# Altium PCB latest_Audio_Meter_V4.5.PcbDoc (part 3 of 4)
Units mil, origin at the board's own origin, x right, y up, seen from the top; angles counter-clockwise.
Board outline 2756.14 x 2519.69 mil, 2 copper layers (Top Layer, Bottom Layer), stack 57.087 mil thick; 115 components, 61 nets, 352 pads, 840 vias.
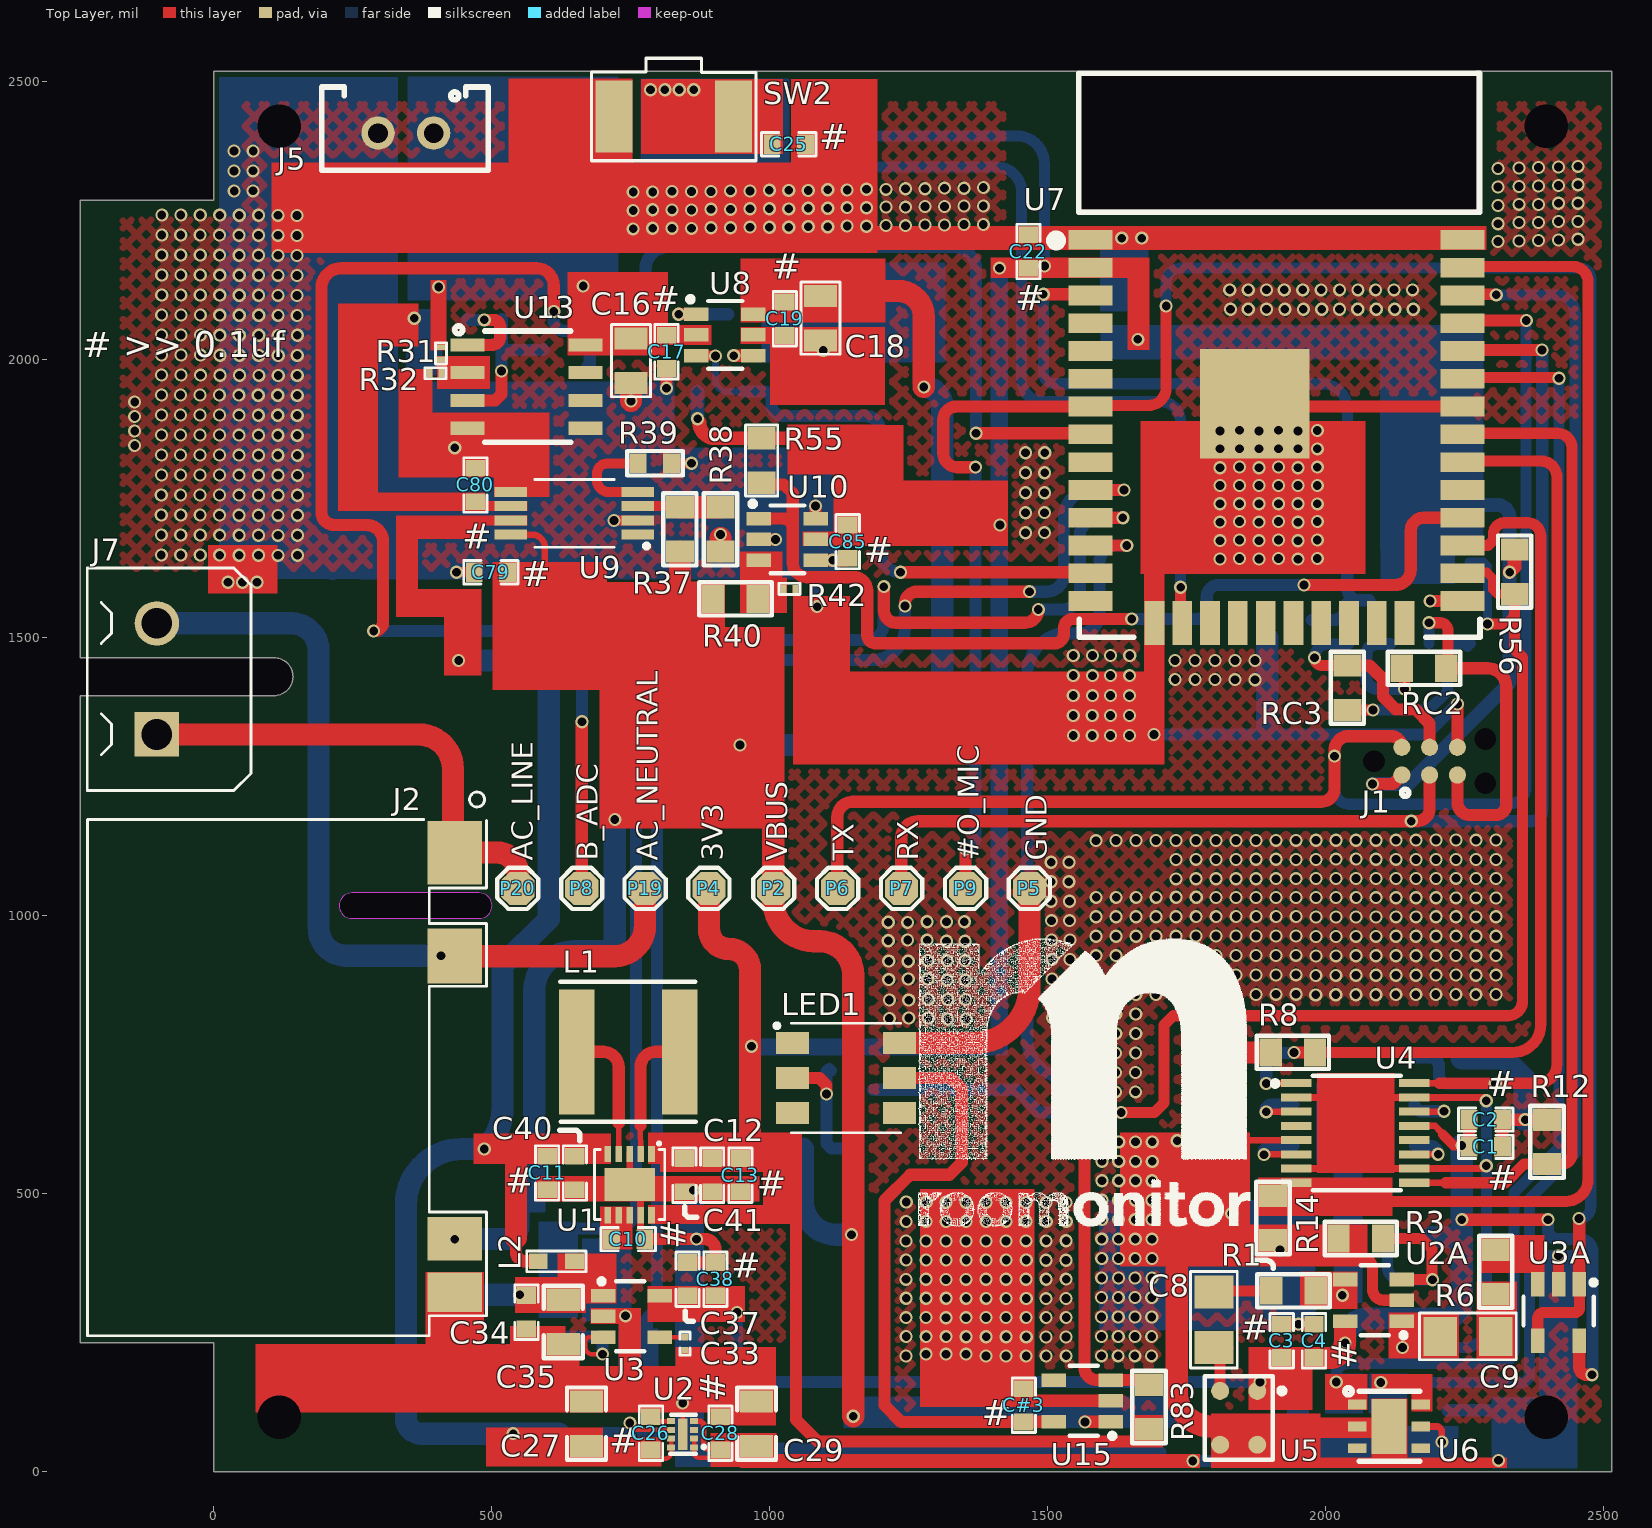
[diagram p0: Top Layer view]

## Part data (continued)
R55: library part ERJ-P06J103V, "RES SMD 10K OHM 5% 1/2W 0805", Case Code (Imperial)=0805, Case Code (Metric)=2012, Manufacturer=Panasonic, Max Operating Temperature=155°C, Max Power Dissipation=500mW, Min Operating Temperature=-55°C, Package Quantity=1, Resistance=10kR, Supplier Part Number 1=P10KADCT-ND, Temperature Coefficient=200ppm/°C, Tolerance=5%, Voltage Rating=400V, Voltage Rating (DC)=150V, Case/Package=0805, ComponentLink1Description=https://www.verical.com/server-webapp/html/getDatasheet?partID=409513, ComponentLink1URL=https://www.verical.com/server-webapp/html/getDatasheet?partID=409513, ComponentLink2Description=http://components.arrow.com/part/dataview/44988207S7163511N1174, ComponentLink2URL=http://components.arrow.com/part/dataview/44988207S7163511N1174, ComponentLink3Description=https://www.seielect.com/Catalog/SEI-RMCF_RMCP.pdf, ComponentLink3URL=https://www.seielect.com/Catalog/SEI-RMCF_RMCP.pdf, ComponentLink4Description=http://www.seielect.com/catalog/sei-rmc.pdf, ComponentLink4URL=http://www.seielect.com/catalog/sei-rmc.pdf, ComponentLink5Description=https://datasheet.ciiva.com/7777/424479-7777391.pdf, ComponentLink5URL=https://datasheet.ciiva.com/7777/424479-7777391.pdf, ComponentLink6Description=https://datasheet.ciiva.com/2581/crcwhpe3-2581488.pdf, ComponentLink6URL=https://datasheet.ciiva.com/2581/crcwhpe3-2581488.pdf, ComponentLink7Description=https://datasheet.ciiva.com/11808/0900766b80d98b26-11808546.pdf, ComponentLink7URL=https://datasheet.ciiva.com/11808/0900766b80d98b26-11808546.pdf, ComponentLink8Description=https://datasheet.ciiva.com/8934/dcrcwe3-8934585.pdf, ComponentLink8URL=https://datasheet.ciiva.com/8934/dcrcwe3-8934585.pdf, ComponentLink9Description=https://datasheet.ciiva.com/2467/dcrcwe3-2467241.pdf, ComponentLink9URL=https://datasheet.ciiva.com/2467/dcrcwe3-2467241.pdf, ComponentLink10Description=https://datasheet.ciiva.com/7777/1697337-7777401.pdf, ComponentLink10URL=https://datasheet.ciiva.com/7777/1697337-7777401.pdf, ComponentLink11Description=https://datasheet.ciiva.com/16852/dcrcwe3-16852347.pdf, ComponentLink11URL=https://datasheet.ciiva.com/16852/dcrcwe3-16852347.pdf, ComponentLink12Description=https://datasheet.ciiva.com/16200/dcrcwe3-16200123.pdf, ComponentLink12URL=https://datasheet.ciiva.com/16200/dcrcwe3-16200123.pdf, ComponentLink13Description=https://datasheet.ciiva.com/16725/70201119-16725227.pdf, ComponentLink13URL=https://datasheet.ciiva.com/16725/70201119-16725227.pdf, ComponentLink14Description=https://datasheet.ciiva.com/2467/dcrcwe3-2467239.pdf, ComponentLink14URL=https://datasheet.ciiva.com/2467/dcrcwe3-2467239.pdf, ComponentLink15Description=https://datasheet.ciiva.com/7777/1720486-7777575.pdf, ComponentLink15URL=https://datasheet.ciiva.com/7777/1720486-7777575.pdf, ComponentLink16Description=https://datasheet.ciiva.com/8934/dcrcwe3-8934581.pdf, ComponentLink16URL=https://datasheet.ciiva.com/8934/dcrcwe3-8934581.pdf, ComponentLink17Description=https://datasheet.ciiva.com/2467/dcrcwe3-2467240.pdf, ComponentLink17URL=https://datasheet.ciiva.com/2467/dcrcwe3-2467240.pdf, ComponentLink18Description=https://datasheet.ciiva.com/7777/1720486-7777576.pdf, ComponentLink18URL=https://datasheet.ciiva.com/7777/1720486-7777576.pdf, ComponentLink19Description=https://datasheet.ciiva.com/5546/dcrcwe3-109170-5546983.pdf, ComponentLink19URL=https://datasheet.ciiva.com/5546/dcrcwe3-109170-5546983.pdf, ComponentLink20Description=https://datasheet.ciiva.com/16755/70201119-16755757.pdf, ComponentLink20URL=https://datasheet.ciiva.com/16755/70201119-16755757.pdf, ComponentLink21Description=https://datasheet.ciiva.com/3258/dcrcwe3-3258221.pdf, ComponentLink21URL=https://datasheet.ciiva.com/3258/dcrcwe3-3258221.pdf, ComponentLink22Description=https://datasheet.ciiva.com/17204/dcrcwe3-17204398.pdf, ComponentLink22URL=https://datasheet.ciiva.com/17204/dcrcwe3-17204398.pdf, ComponentLink23Description=https://datasheet.ciiva.com/16435/dcrcwe3-16435934.pdf, ComponentLink23URL=https://datasheet.ciiva.com/16435/dcrcwe3-16435934.pdf, ComponentLink24Description=https://datasheet.ciiva.com/46441/1533075-46441628.pdf, ComponentLink24URL=https://datasheet.ciiva.com/46441/1533075-46441628.pdf, ComponentLink25Description=https://datasheet.ciiva.com/5544/dcrcwe3-109170-5544649.pdf, ComponentLink25URL=https://datasheet.ciiva.com/5544/dcrcwe3-109170-5544649.pdf, ComponentLink26Description=https://datasheet.ciiva.com/8337/dcrcwe3-8337669.pdf, ComponentLink26URL=https://datasheet.ciiva.com/8337/dcrcwe3-8337669.pdf, ComponentLink27Description=https://datasheet.ciiva.com/2463/dcrcwe3-2463179.pdf, ComponentLink27URL=https://datasheet.ciiva.com/2463/dcrcwe3-2463179.pdf, ComponentLink28Description=https://datasheet.ciiva.com/2463/dcrcwe3-2463178.pdf, ComponentLink28URL=https://datasheet.ciiva.com/2463/dcrcwe3-2463178.pdf, ComponentLink29Description=https://datasheet.ciiva.com/2474/crcwhpe3-2474640.pdf, ComponentLink29URL=https://datasheet.ciiva.com/2474/crcwhpe3-2474640.pdf, ComponentLink30Description=https://datasheet.ciiva.com/48527/crcwhpe3-48527638.pdf, ComponentLink30URL=https://datasheet.ciiva.com/48527/crcwhpe3-48527638.pdf, ComponentLink31Description=https://datasheet.ciiva.com/5547/crcwhpe3-46056-5547896.pdf, ComponentLink31URL=https://datasheet.ciiva.com/5547/crcwhpe3-46056-5547896.pdf, ComponentLink32Description=https://datasheet.ciiva.com/9112/crcwhpe3-9112140.pdf, ComponentLink32URL=https://datasheet.ciiva.com/9112/crcwhpe3-9112140.pdf, ComponentLink33Description=https://datasheet.ciiva.com/2474/crcwhpe3-2474638.pdf, ComponentLink33URL=https://datasheet.ciiva.com/2474/crcwhpe3-2474638.pdf, ComponentLink34Description=https://datasheet.ciiva.com/2474/crcwhpe3-2474639.pdf, ComponentLink34URL=https://datasheet.ciiva.com/2474/crcwhpe3-2474639.pdf, ComponentLink35Description=http://uk.rs-online.com/webdocs/12cb/0900766b812cb812.pdf?src-supplier=RSComponents, ComponentLink35URL=http://uk.rs-online.com/webdocs/12cb/0900766b812cb812.pdf?src-supplier=RSComponents, ComponentLink36Description=http://industrial.panasonic.com/www-data/pdf/AOA0000/AOA0000CE4.pdf?src-supplier=Avnet, ComponentLink36URL=http://industrial.panasonic.com/www-data/pdf/AOA0000/AOA0000CE4.pdf?src-supplier=Avnet, ComponentLink37Description=http://industrial.panasonic.com/www-data/pdf/AOA0000/AOA0000CE4.pdf?src-supplier=Future+Electronics, ComponentLink37URL=http://industrial.panasonic.com/www-data/pdf/AOA0000/AOA0000CE4.pdf?src-supplier=Future+Electronics, ComponentLink38Description=http://www.farnell.com/datasheets/2059624.pdf?src-supplier=Element14, ComponentLink38URL=http://www.farnell.com/datasheets/2059624.pdf?src-supplier=Element14, ComponentLink39Description=https://www.alliedelec.com/m/d/12e4be79354a6c30aae91f11e8182ea0.pdf?src-supplier=Allied+Electronics, ComponentLink39URL=https://www.alliedelec.com/m/d/12e4be79354a6c30aae91f11e8182ea0.pdf?src-supplier=Allied+Electronics, ComponentLink40Description=http://www.farnell.com/datasheets/2059624.pdf?src-supplier=Farnell, ComponentLink40URL=http://www.farnell.com/datasheets/2059624.pdf?src-supplier=Farnell, Composition="Thick Film", Contact Plating=Tin, Depth=1.25mm, Features="Automotive AEC-Q200", Height=0.6mm, Lead Free="Lead Free", Length=2mm, Manufacturer Part Number=ERJ-P06J103V, Military Standard=Not, Mount="Surface Mount", Number of Terminations=2, Packaging="Tape and Reel", Power Rating=500mW, Pricing 1="1=0.11, 10=0.103, 100=0.0396, 1000=0.0174, 2500=0.0151 (USD)", Radiation Hardening=No, REACH SVHC=Unknown, Stock 1=130484, Supplier 1=Digi-Key, Termination=SMD/SMT, Weight=0.000194oz, Width=0.049inch
SW2: library part KSS221GLFS, "Tactile Switch SPST-NO Side Actuated Surface Mount, Right Angle", Contact Current Rating=50mA, Contact Resistance=100mR, Insulation Resistance=1GR, IP Rating=IP40, Manufacturer="ITT C&K", Max Operating Temperature=85°C, Max Voltage Rating (DC)=32V, Min Operating Temperature=-40°C, Operating Force=2N, Package Quantity=1, Power Rating=1W, Supplier Part Number 1=401-1097-6-ND, Actuator Length=0.8mm, ComponentLink1Description=https://datasheet.ciiva.com/26917/getdatasheetpartid-773364-26917575.pdf, ComponentLink1URL=https://datasheet.ciiva.com/26917/getdatasheetpartid-773364-26917575.pdf, ComponentLink2Description=https://datasheet.ciiva.com/30466/0900766b8129cd37-30466697.pdf, ComponentLink2URL=https://datasheet.ciiva.com/30466/0900766b8129cd37-30466697.pdf, ComponentLink3Description=https://datasheet.ciiva.com/16496/kss221g20lfs-16496166.pdf, ComponentLink3URL=https://datasheet.ciiva.com/16496/kss221g20lfs-16496166.pdf, ComponentLink4Description=https://datasheet.ciiva.com/18145/getdatasheetpartid-313005-18145235.pdf, ComponentLink4URL=https://datasheet.ciiva.com/18145/getdatasheetpartid-313005-18145235.pdf, ComponentLink5Description=https://datasheet.ciiva.com/16155/kss221glfs-ckcomponents-16155741.pdf, ComponentLink5URL=https://datasheet.ciiva.com/16155/kss221glfs-ckcomponents-16155741.pdf, ComponentLink6Description=https://datasheet.ciiva.com/5684/19445-5684460.pdf, ComponentLink6URL=https://datasheet.ciiva.com/5684/19445-5684460.pdf, ComponentLink7Description=https://datasheet.ciiva.com/2900/kss-2900345.pdf, ComponentLink7URL=https://datasheet.ciiva.com/2900/kss-2900345.pdf, ComponentLink8Description=https://datasheet.ciiva.com/2900/kss-2900343.pdf, ComponentLink8URL=https://datasheet.ciiva.com/2900/kss-2900343.pdf, ComponentLink9Description=https://datasheet.ciiva.com/7986/19445-7986997.pdf, ComponentLink9URL=https://datasheet.ciiva.com/7986/19445-7986997.pdf, ComponentLink10Description=https://datasheet.ciiva.com/2900/kss-2900344.pdf, ComponentLink10URL=https://datasheet.ciiva.com/2900/kss-2900344.pdf, Contact Material=Silver, Contact Plating=Silver, Current Rating=50mA, Depth=4.4mm, Illumination Type=Non-Illuminated,Illuminated, Lead Free="Lead Free", Length=4.5mm, Manufacturer Part Number=KSS221GLFS, Max Current Rating=50mA, Mechanical Life=100000Cycles, Mount="Surface Mount", Orientation="Right Angle", Packaging="Tape and Reel", Pricing 1="1=0.68, 10=0.655, 25=0.6424, 50=0.6182, 100=0.5334, 250=0.4849, 500=0.4607, 1000=0.3637 (USD)", Radiation Hardening=No, REACH SVHC="No SVHC", Stock 1=17242, Supplier 1=Digi-Key, Switch Function=Off-Mom, Switch Travel=0.3mm, Termination="Gull Wing", Throw Configuration=SPST, Voltage Rating (DC)=32V, Width=7mm
U1: "Conv DC-DC 1.8V to 5.5V Non-Inv/Inv/Step Up/Step Down Single-Out 3.3V 0.8A 10-Pin WSON", Manufacturer="Texas Instruments", Max Input Voltage=5.5V, Max Operating Temperature=85°C, Max Output Current=800mA, Min Input Voltage=1.8V, Min Operating Temperature=-40°C, Min Output Voltage=3.3V, Package Quantity=3000, Quiescent Current=25uA, Supplier Part Number 1=TPS63031DSKR**MULT1, Switching Frequency=2.4MHz, ComponentLink1Description=http://www.ti.com/lit/ds/symlink/tps63001.pdf, ComponentLink1URL=http://www.ti.com/lit/ds/symlink/tps63001.pdf, ComponentLink2Description=http://focus.ti.com/lit/ds/symlink/tps63001.pdf, ComponentLink2URL=http://focus.ti.com/lit/ds/symlink/tps63001.pdf, ComponentLink3Description=http://www.ti.com/general/docs/lit/getliterature.tsp?genericPartNumber=TPS63002&&fileType=pdf, ComponentLink3URL=http://www.ti.com/general/docs/lit/getliterature.tsp?genericPartNumber=TPS63002&&fileType=pdf, ComponentLink4Description=http://www.ti.com/general/docs/lit/getliterature.tsp?genericPartNumber=TPS63031&&fileType=pdf&src-supplier=Avnet, ComponentLink4URL=http://www.ti.com/general/docs/lit/getliterature.tsp?genericPartNumber=TPS63031&&fileType=pdf&src-supplier=Avnet, ComponentLink5Description=http://www.ti.com/lit/ds/symlink/tps63030.pdf?src-supplier=Digi-Key, ComponentLink5URL=http://www.ti.com/lit/ds/symlink/tps63030.pdf?src-supplier=Digi-Key, Contact Plating=Gold, Efficiency=96%, Lead Free="Lead Free", Manufacturer Part Number=TPS63031DSKR, Mount="Surface Mount", Nominal Output Voltage=3.3V, Number of Outputs=1, Number of Pins=10, Operating Supply Voltage=5.5V, Output Configuration=Positive, Output Current=800mA, Output Type=Fixed, Output Voltage=3.3V, Packaging="Tape and Reel", Radiation Hardening=No, REACH SVHC="No SVHC", Stock 1=0, Supplier 1=Arrow, Synchronous Rectifier=Yes, Topology=Buck-Boost
U2: "IC REG LINEAR 3.3V 1A 8XDFN", Dropout Voltage=95mV, Manufacturer="ON Semiconductor", Max Operating Temperature=125°C, Min Current Limit=1.1A, Min Operating Temperature=-40°C, Output Current=1A, Output Voltage=3.3V, Supplier Part Number 1=NCP186AMX330TAGOSCT-ND, ComponentLink1Description=http://www.farnell.com/datasheets/2236905.pdf?src-supplier=Farnell, ComponentLink1URL=http://www.farnell.com/datasheets/2236905.pdf?src-supplier=Farnell, ComponentLink2Description=http://www.farnell.com/datasheets/2236905.pdf?src-supplier=Newark, ComponentLink2URL=http://www.farnell.com/datasheets/2236905.pdf?src-supplier=Newark, ComponentLink3Description=http://www.onsemi.com/pub/Collateral/NCP186-D.PDF?src-supplier=Digi-Key, ComponentLink3URL=http://www.onsemi.com/pub/Collateral/NCP186-D.PDF?src-supplier=Digi-Key, ComponentLink4Description=https://www.onsemi.com/pub/Collateral/NCP186-D.PDF?src-supplier=Digi-Key, ComponentLink4URL=https://www.onsemi.com/pub/Collateral/NCP186-D.PDF?src-supplier=Digi-Key, Lead Free="Lead Free", Manufacturer Part Number=NCP186AMX330TAG, Mount="Surface Mount", Number of Pins=8, Number of Regulators=1, Packaging="Tape and Reel", Pricing 1="1=0.48, 10=0.39, 25=0.3564, 100=0.2405, 250=0.199, 500=0.18242, 1000=0.13682 (USD)", Stock 1=5995, Supplier 1=Digi-Key
U2A U3A: "IC OPAMP GP 1 CIRCUIT SOT23-5", Case/Package=SOT-23, Input Bias Current=10pA, Input Offset Voltage (Vos)=1mV, Manufacturer="Texas Instruments", Max Operating Temperature=85°C, Max Supply Voltage=5.5V, Min Operating Temperature=-40°C, Min Supply Voltage=2.7V, Nominal Supply Current=250uA, Output Current per Channel=15mA, Package Quantity=250, Power Supply Rejection Ratio (PSRR)=90.46dB, Quiescent Current=250mA, Supplier Part Number 1=OPA344NACT-ND, Voltage Gain=122dB, Bandwidth=1MHz, Common Mode Rejection Ratio=76dB, ComponentLink1Description=http://www.ti.com/general/docs/lit/getliterature.tsp?genericPartNumber=OPA344&fileType=pdf&src-supplier=Newark, ComponentLink1URL=http://www.ti.com/general/docs/lit/getliterature.tsp?genericPartNumber=OPA344&fileType=pdf&src-supplier=Newark, ComponentLink2Description=http://www.farnell.com/datasheets/1882856.pdf?src-supplier=Element14, ComponentLink2URL=http://www.farnell.com/datasheets/1882856.pdf?src-supplier=Element14, ComponentLink3Description=http://www.ti.com/lit/ds/symlink/opa344.pdf?src-supplier=Digi-Key, ComponentLink3URL=http://www.ti.com/lit/ds/symlink/opa344.pdf?src-supplier=Digi-Key, ComponentLink4Description=http://focus.ti.com/lit/ds/symlink/opa344.pdf?src-supplier=Avnet+Europe, ComponentLink4URL=http://focus.ti.com/lit/ds/symlink/opa344.pdf?src-supplier=Avnet+Europe, ComponentLink5Description=http://www.ti.com/general/docs/lit/getliterature.tsp?genericPartNumber=OPA4345&&fileType=pdf&src-supplier=Avnet, ComponentLink5URL=http://www.ti.com/general/docs/lit/getliterature.tsp?genericPartNumber=OPA4345&&fileType=pdf&src-supplier=Avnet, Gain Bandwidth Product=1MHz, Height=1.15mm, Lead Free="Lead Free", Length=2.9mm, Manufacturer Part Number=OPA344NA/250, Max I/O Voltage=1mV, Number of Amplifiers=1, Number of Channels=1, Number of Circuits=1, Number of Elements=1, Number of Pins=5, Packaging="Tape and Reel", Pricing 1="1=1.59, 10=1.43, 25=1.3492, 100=1.0794 (USD)", Radiation Hardening=No, REACH SVHC="No SVHC", Slew Rate=0.8V/µs, Stock 1=6132, Supplier 1=Digi-Key, Unity Gain Bandwidth Product=1MHz, Width=1.6mm
U3: "IC REG LINEAR 3.3V 150MA SOT23-5", Case/Package=SOT-23, Dropout Voltage=280mV, Input Bias Current=850uA, Manufacturer="Texas Instruments", Max Input Voltage=16V, Max Operating Temperature=125°C, Max Output Current=150mA, Min Input Voltage=2.2V, Min Operating Temperature=-40°C, Nominal Output Voltage=3.3V, Output Voltage Accuracy=1%, Package Quantity=1, Supplier Part Number 1=296-26127-1-ND, Accuracy=1%, Category="Voltage Regulators - Linear", ComponentLink1Description=https://datasheet.ciiva.com/2062/lp2985a-33-2062277.pdf?src-supplier=Digi-Key, ComponentLink1URL=https://datasheet.ciiva.com/2062/lp2985a-33-2062277.pdf?src-supplier=Digi-Key, ComponentLink2Description=https://datasheet.ciiva.com/2062/lp2985a-33-2062278.pdf?src-supplier=Digi-Key, ComponentLink2URL=https://datasheet.ciiva.com/2062/lp2985a-33-2062278.pdf?src-supplier=Digi-Key, ComponentLink3Description=https://datasheet.ciiva.com/2062/lp2985a-33-2062279.pdf?src-supplier=Digi-Key, ComponentLink3URL=https://datasheet.ciiva.com/2062/lp2985a-33-2062279.pdf?src-supplier=Digi-Key, Height=1.15mm, Lead Free="Lead Free", Length=2.9mm, Manufacturer Part Number=LP2985A-33DBVT, Number of Outputs=1, Number of Pins=5, Number of Regulators=1, Output Current=150mA, Output Type=Fixed, Output Voltage=3.3V, Packaging="Tape and Reel", Polarity=Positive, Pricing 1="1=0.60000, 10=0.53200, 25=0.49960, 100=0.37860 (USD)", Quiescent Current=850uA, Radiation Hardening=No, RoHS=Yes, RoHS Compliant=Yes, Series=-, Stock 1=112, Supplier 1=Digi-Key, Width=1.6mm
U4: "IC SWITCH QUAD SPST 16TSSOP", Case/Package=TSSOP, High Level Output Current=30mA, Manufacturer="Analog Devices", Max Operating Temperature=85°C, Max Power Dissipation=5uW, Max Supply Current=1uA, Max Supply Voltage=5.5V, Min Operating Temperature=-40°C, Min Supply Voltage=1.8V, On-State Resistance=4R, Operating Supply Current=1nA, Package Quantity=1, Power Dissipation=430mW, Supplier Part Number 1=ADG712BRUZ-REELCT-ND, -3db Bandwidth=200MHz, Bandwidth=200MHz, ComponentLink1Description=http://www.analog.com/media/en/technical-documentation/data-sheets/ADG711_712_713.pdf?src-supplier=Digi-Key, ComponentLink1URL=http://www.analog.com/media/en/technical-documentation/data-sheets/ADG711_712_713.pdf?src-supplier=Digi-Key, ComponentLink2Description=http://datasheet.iiic.cc/analog_devices/ADG712BRUZ-REEL.pdf?src-supplier=IIIC, ComponentLink2URL=http://datasheet.iiic.cc/analog_devices/ADG712BRUZ-REEL.pdf?src-supplier=IIIC, Contact Plating=Tin,Matte, Interface=Parallel, Lead Free="Contains Lead", Manufacturer Part Number=ADG712BRUZ-REEL, Mount="Surface Mount", Number of Bits=4, Number of Channels=4, Number of Circuits=4, Number of Inputs=4, Number of Outputs=4, Number of Pins=16, Packaging="Tape and Reel", Polarity=Non-Inverting, Pricing 1="1=2.89, 10=2.598, 25=2.4564, 100=2.129, 250=2.01984, 500=1.81238, 1000=1.52852 (USD)", Stock 1=4085, Supplier 1=Digi-Key, Supply Type=Single, Throw Configuration=SPST, Turn-Off Delay Time=6ns, Turn-On Delay Time=11ns
U5: "SPU-TOP MIC IOT FOCUSED MIC", Manufacturer=Knowles, Operating Supply Current=250uA, Operating Supply Voltage=3.6V, Package Quantity=1200, Supplier Part Number 1=423-1138-1-ND, ComponentLink1Description=https://media.digikey.com/pdf/Data%20Sheets/Knowles%20Acoustics%20PDFs/SiSonic_Design_Guide.pdf?src-supplier=Mouser, ComponentLink1URL=https://media.digikey.com/pdf/Data%20Sheets/Knowles%20Acoustics%20PDFs/SiSonic_Design_Guide.pdf?src-supplier=Mouser, ComponentLink2Description=https://media.digikey.com/pdf/Data%20Sheets/Knowles%20Acoustics%20PDFs/SiSonic_Design_Guide.pdf?src-supplier=Digi-Key, ComponentLink2URL=https://media.digikey.com/pdf/Data%20Sheets/Knowles%20Acoustics%20PDFs/SiSonic_Design_Guide.pdf?src-supplier=Digi-Key, Depth=1.2mm, Direction=Omnidirectional, Height=1.2mm, Impedance=300R, Length=3.76mm, Manufacturer Part Number=SPU0410HR5H-PB, Output Type=Analog, Packaging="Tape and Reel", Pricing 1="1=0.82, 10=0.688, 25=0.6376, 50=0.6006, 100=0.5649, 500=0.48696 (USD)", Shape=Rectangular, Signal to Noise Ratio (SNR)=59dB, Stock 1=83682, Supplier 1=Digi-Key, Termination=SMD/SMT, Voltage Rating=3.6V, Width=2.95mm
U6: "SENS HUMID/TEMP 3.6V I2C 2% 6DFN", Manufacturer="Silicon Labs", Max Operating Temperature=85°C, Min Operating Temperature=-40°C, Supplier Part Number 1=336-4380-1-ND, Accuracy=3%, ComponentLink1Description=https://www.silabs.com/Support%20Documents/TechnicalDocs/Si7021-A20.pdf?src-supplier=Avnet, ComponentLink1URL=https://www.silabs.com/Support%20Documents/TechnicalDocs/Si7021-A20.pdf?src-supplier=Avnet, ComponentLink2Description=https://www.silabs.com/documents/public/data-sheets/Si7021-A20.pdf?src-supplier=Newark, ComponentLink2URL=https://www.silabs.com/documents/public/data-sheets/Si7021-A20.pdf?src-supplier=Newark, ComponentLink3Description=https://www.silabs.com/Support%20Documents%2fTechnicalDocs%2fSi7021-A20.pdf?src-supplier=Digi-Key, ComponentLink3URL=https://www.silabs.com/Support%20Documents%2fTechnicalDocs%2fSi7021-A20.pdf?src-supplier=Digi-Key, ComponentLink4Description=https://www.silabs.com/Support%20Documents/TechnicalDocs/Si7021-A20.pdf?src-supplier=Avnet+Asia, ComponentLink4URL=https://www.silabs.com/Support%20Documents/TechnicalDocs/Si7021-A20.pdf?src-supplier=Avnet+Asia, ComponentLink5Description=https://www.silabs.com/documents/public/data-sheets/Si7021-A20.pdf?src-supplier=Digi-Key, ComponentLink5URL=https://www.silabs.com/documents/public/data-sheets/Si7021-A20.pdf?src-supplier=Digi-Key, ComponentLink6Description=https://www.silabs.com/documents/public/data-sheets/Si7021-A20.pdf?src-supplier=Farnell, ComponentLink6URL=https://www.silabs.com/documents/public/data-sheets/Si7021-A20.pdf?src-supplier=Farnell, Manufacturer Part Number=SI7021-A20-GM1R, Mount="Surface Mount", Output Type=I2C,Digital, Pricing 1="1=3.37, 25=3.2436, 100=3.2313 (USD)", Response Time=18s, Sensor Type=Temperature, Stock 1=8770, Supplier 1=Digi-Key
U7: "WIFI MODULE 128MBITS SPI FLASH", Case/Package=SMD/SMT, Frequency=2.5GHz, Manufacturer="Espressif Systems", Manufacturer Part Number=ESP32-WROOM-32D(16MB), Max Operating Temperature=85°C, Min Operating Temperature=-40°C, Supplier Part Number 1=356-ES32WROOM32D16MB, ComponentLink1Description=https://www.espressif.com/sites/default/files/documentation/esp32-wroom-32d_esp32-wroom-32u_datasheet_en.pdf?src-supplier=Digi-Key, ComponentLink1URL=https://www.espressif.com/sites/default/files/documentation/esp32-wroom-32d_esp32-wroom-32u_datasheet_en.pdf?src-supplier=Digi-Key, Data Rate=150Mbps, Interface=I2C,SPI,GPIO,PWM,SDIO,UART, Memory Size=536KB, Mount="Surface Mount", Packaging="Tape and Reel", Pricing 1="1=4.5, 5=4.5 (USD)", Sensitivity=-98dBm, Stock 1=3620, Supplier 1=Mouser
U8: "IC BAT CHG LI-ION 1 CELL SOT23-6", Battery Pack Voltage=4.2V, Case/Package=SOT-23-6, Manufacturer="Texas Instruments", Max Charge Current=800mA, Max Operating Temperature=125°C, Max Supply Voltage=6.45V, Min Operating Temperature=0°C, Supplier Part Number 1=296-47315-1-ND, ComponentLink1Description=http://www.ti.com/lit/ds/symlink/bq21040.pdf?src-supplier=Digi-Key, ComponentLink1URL=http://www.ti.com/lit/ds/symlink/bq21040.pdf?src-supplier=Digi-Key, ComponentLink2Description=http://www.ti.com/general/docs/suppproductinfo.tsp?distId=10&gotoUrl=http%3A%2F%2Fwww.ti.com%2Flit%2Fgpn%2Fbq21040&src-supplier=Digi-Key, ComponentLink2URL=http://www.ti.com/general/docs/suppproductinfo.tsp?distId=10&gotoUrl=http%3A%2F%2Fwww.ti.com%2Flit%2Fgpn%2Fbq21040&src-supplier=Digi-Key, ComponentLink3Description=http://www.ti.com/general/docs/suppproductinfo.tsp?distId=10&amp;gotoUrl=http%3A%2F%2Fwww.ti.com%2Flit%2Fgpn%2Fbq21040&src-supplier=Digi-Key, ComponentLink3URL=http://www.ti.com/general/docs/suppproductinfo.tsp?distId=10&amp;gotoUrl=http%3A%2F%2Fwww.ti.com%2Flit%2Fgpn%2Fbq21040&src-supplier=Digi-Key, Differential Output=No, Fault Protection="Over Voltage,Over Temperature,Short Circuit", Interface=USB,SPI, Lead Free="Lead Free", Manufacturer Part Number=BQ21040DBVR, Mount="Surface Mount", Number of Bits=16, Number of Cells=1, Number of D/A Converters=4, Output Type="Analog Current/Voltage", Packaging="Cut Tape", Pricing 1="1=1.14, 10=1.015, 100=0.7396, 500=0.61924, 1000=0.48163 (USD)", Settling Time=30us, Stock 1=5958, Supplier 1=Digi-Key
U9: "IC OR CTRLR SRC SELECT 8TSSOP", Case/Package=TSSOP, Current - Output 2=1.25A, Manufacturer="Texas Instruments", Max Input Voltage=5.5V, Max Operating Temperature=85°C, Max Power Dissipation=387mW, Min Input Voltage=2.8V, Min Operating Temperature=-40°C, Nominal Supply Current=55uA, On-State Resistance=84mR, Output Voltage=6V, Package Quantity=1, Supplier Part Number 1=296-16936-1-ND, Category="Voltage Regulators - Switching", ComponentLink1Description=https://datasheet.ciiva.com/1960/tps2110a-1960784.pdf?src-supplier=Digi-Key, ComponentLink1URL=https://datasheet.ciiva.com/1960/tps2110a-1960784.pdf?src-supplier=Digi-Key, ComponentLink2Description=https://datasheet.ciiva.com/15109/getdatasheetpartid-292403-15109270.pdf?src-supplier=Verical, ComponentLink2URL=https://datasheet.ciiva.com/15109/getdatasheetpartid-292403-15109270.pdf?src-supplier=Verical, ComponentLink3Description=https://datasheet.ciiva.com/1960/tps2110a-1960785.pdf?src-supplier=Digi-Key, ComponentLink3URL=https://datasheet.ciiva.com/1960/tps2110a-1960785.pdf?src-supplier=Digi-Key, ComponentLink4Description=https://datasheet.ciiva.com/1645/1836501-1645122.pdf?src-supplier=Newark, ComponentLink4URL=https://datasheet.ciiva.com/1645/1836501-1645122.pdf?src-supplier=Newark, ComponentLink5Description=https://datasheet.ciiva.com/7986/1836501-7986421.pdf?src-supplier=Element14, ComponentLink5URL=https://datasheet.ciiva.com/7986/1836501-7986421.pdf?src-supplier=Element14, ComponentLink6Description=https://datasheet.ciiva.com/28483/1836501-28483178.pdf?src-supplier=Element14, ComponentLink6URL=https://datasheet.ciiva.com/28483/1836501-28483178.pdf?src-supplier=Element14, ComponentLink7Description=https://datasheet.ciiva.com/1960/tps2110a-1960783.pdf?src-supplier=Digi-Key, ComponentLink7URL=https://datasheet.ciiva.com/1960/tps2110a-1960783.pdf?src-supplier=Digi-Key, ComponentLink8Description=https://datasheet.ciiva.com/3232/tps2110a-3232511.pdf?src-supplier=Avnet, ComponentLink8URL=https://datasheet.ciiva.com/3232/tps2110a-3232511.pdf?src-supplier=Avnet, Lead Free="Lead Free", Manufacturer Part Number=TPS2111APWR, Max Output Current=1.25A, Number of Circuits=2, Number of Inputs=2, Number of Outputs=1, Number of Pins=8, Operating Supply Current=55uA, Operating Supply Voltage=5.5V, Output Current=1.25A, Packaging="Tape and Reel", Pricing 1="1=2.48000, 10=2.22500, 25=2.09880, 100=1.67900, 250=1.46916, 500=1.42718, 1000=1.13335 (USD)", Radiation Hardening=No, REACH SVHC="No SVHC", RoHS=Yes, RoHS Compliant=Yes, Series=TPS2111A, Stock 1=14704, Supplier 1=Digi-Key, Turn-Off Delay Time=5ms, Turn-On Delay Time=1ms, Weight=0.001376oz
U10: "IC SUPERVISOR 1 CHANNEL TSOT23-6", Case/Package=SOT-23-6, Manufacturer="Texas Instruments", Max Operating Temperature=125°C, Max Supply Voltage=36V, Min Operating Temperature=-40°C, Min Supply Voltage=1.8V, Number of Voltages Monitored=1, Quiescent Current=7uA, Supplier Part Number 1=296-43315-1-ND, Threshold Voltage=400mV, Category=Comparators, ComponentLink1Description=http://www.ti.com/general/docs/lit/getliterature.tsp?genericPartNumber=TPS3711&&fileType=pdf&src-supplier=Element14, ComponentLink1URL=http://www.ti.com/general/docs/lit/getliterature.tsp?genericPartNumber=TPS3711&&fileType=pdf&src-supplier=Element14, ComponentLink2Description=http://www.ti.com/lit/ds/symlink/tps3711.pdf?src-supplier=Digi-Key, ComponentLink2URL=http://www.ti.com/lit/ds/symlink/tps3711.pdf?src-supplier=Digi-Key, ComponentLink3Description=http://www.ti.com/lit/gpn/tps3711?src-supplier=Mouser, ComponentLink3URL=http://www.ti.com/lit/gpn/tps3711?src-supplier=Mouser, Lead Free="Lead Free", Manufacturer Part Number=TPS3711DDCT, Mount="Surface Mount", Number of Pins=6, Packaging="Cut Tape", Pricing 1="1=2.50000, 10=2.24700, 25=2.12000, 100=1.69600 (USD)", REACH SVHC="No SVHC", RoHS=Yes, RoHS Compliant=Yes, Stock 1=711, Supplier 1=Digi-Key, Type="Voltage Detector"
U12: "IC VREF SHUNT 18V 0.5% SOT23", Case/Package=SOT-23, Cathode Current=100uA, Manufacturer="Diodes Zetex", Max Input Voltage=20V, Max Operating Temperature=125°C, Max Output Current=15mA, Max Output Voltage=18V, Min Operating Temperature=-40°C, Min Output Voltage=1.24V, Package Quantity=1, Supplier Part Number 1=TLV431BFCT-ND, Tolerance=0.5%, ComponentLink1Description=https://www.diodes.com/assets/Datasheets/TLV431.pdf?src-supplier=Digi-Key, ComponentLink1URL=https://www.diodes.com/assets/Datasheets/TLV431.pdf?src-supplier=Digi-Key, ComponentLink2Description=http://www.farnell.com/datasheets/1904413.pdf?src-supplier=Element14, ComponentLink2URL=http://www.farnell.com/datasheets/1904413.pdf?src-supplier=Element14, ComponentLink3Description=http://www.farnell.com/datasheets/2100168.pdf?src-supplier=Element14, ComponentLink3URL=http://www.farnell.com/datasheets/2100168.pdf?src-supplier=Element14, ComponentLink4Description=http://www.diodes.com/datasheets/TLV431.pdf?src-supplier=Future+Electronics, ComponentLink4URL=http://www.diodes.com/datasheets/TLV431.pdf?src-supplier=Future+Electronics, Height=1.02mm, Lead Free="Lead Free", Length=3.04mm, Manufacturer Part Number=TLV431BFTA, Mount="Surface Mount", Number of Pins=3, Output Current=15mA, Output Type=Adjustable, Output Voltage=18V, Packaging="Tape and Reel", Pricing 1="1=0.49, 10=0.417, 25=0.3888, 100=0.2889, 250=0.24444, 500=0.23332, 1000=0.17221 (USD)", Radiation Hardening=No, REACH SVHC="No SVHC", Reference Type=Shunt,Adjustable, Reference Voltage=18V, Stock 1=51651, Supplier 1=Digi-Key, Width=1.4mm
U13: "IC COMPARATOR LP DUAL 8-SOIC", Case/Package=SO, Dual Supply Voltage=9V, Input Bias Current=250nA, Input Offset Voltage (Vos)=5mV, Manufacturer=STMicroelectronics, Max Dual Supply Voltage=18V, Max Operating Temperature=70°C, Max Power Dissipation=710mW, Max Supply Current=1mA, Max Supply Voltage=36V, Min Dual Supply Voltage=1V, Min Operating Temperature=0°C, Min Supply Voltage=2V, Natural Thermal Resistance=125°C/W, Operating Supply Voltage=28V, Output Current=18mA, Output Current per Channel=100pA, Package Quantity=2500, Quiescent Current=2.5mA, Supplier Part Number 1=497-1593-1-ND, Voltage Gain=106.02dB, ComponentLink1Description=http://www.st.com/content/ccc/resource/technical/document/datasheet/group1/b4/cc/cf/13/18/28/44/f5/CD00000465/files/CD00000465.pdf/jcr:content/translations/en.CD00000465.pdf?src-supplier=Digi-Key, ComponentLink1URL=http://www.st.com/content/ccc/resource/technical/document/datasheet/group1/b4/cc/cf/13/18/28/44/f5/CD00000465/files/CD00000465.pdf/jcr:content/translations/en.CD00000465.pdf?src-supplier=Digi-Key, ComponentLink2Description=https://www.verical.com/server-webapp/html/getDatasheet?partID=302604&src-supplier=Verical, ComponentLink2URL=https://www.verical.com/server-webapp/html/getDatasheet?partID=302604&src-supplier=Verical, ComponentLink3Description=http://www.st.com/st-web-ui/static/active/en/resource/technical/document/datasheet/CD00000465.pdf?src-supplier=Avnet, ComponentLink3URL=http://www.st.com/st-web-ui/static/active/en/resource/technical/document/datasheet/CD00000465.pdf?src-supplier=Avnet, ComponentLink4Description=http://www.mouser.com/ds/2/389/lm193-955038.pdf?src-supplier=Mouser, ComponentLink4URL=http://www.mouser.com/ds/2/389/lm193-955038.pdf?src-supplier=Mouser, ComponentLink5Description=http://www.farnell.com/datasheets/2291162.pdf?src-supplier=Element14, ComponentLink5URL=http://www.farnell.com/datasheets/2291162.pdf?src-supplier=Element14, ComponentLink6Description=https://www.distrelec.biz/Web/Downloads/_e/ng/LM393_ST_tds_eng.pdf?mime=application%2Fpdf&src-supplier=Distrelec, ComponentLink6URL=https://www.distrelec.biz/Web/Downloads/_e/ng/LM393_ST_tds_eng.pdf?mime=application%2Fpdf&src-supplier=Distrelec, ComponentLink7Description=http://www.st.com/web/en/resource/technical/document/datasheet/CD00000465.pdf?src-supplier=Future+Electronics, ComponentLink7URL=http://www.st.com/web/en/resource/technical/document/datasheet/CD00000465.pdf?src-supplier=Future+Electronics, ComponentLink8Description=http://datasheet.iiic.cc/stmicroelectronics/LM393DT.pdf?src-supplier=IIIC, ComponentLink8URL=http://datasheet.iiic.cc/stmicroelectronics/LM393DT.pdf?src-supplier=IIIC, Contact Plating=Gold, Height=1.25mm, Lead Free="Lead Free", Length=4.9mm, Manufacturer Part Number=LM393DT, Max Input Current=250nA, Mount="Surface Mount", Nominal Supply Current=1mA, Number of Channels=2, Number of Elements=2, Number of Pins=8, Output Type=TTL, Packaging="Tape and Reel", Pricing 1="1=0.48, 10=0.358, 25=0.3136, 100=0.1792, 250=0.168, 500=0.1344, 1000=0.10304 (USD)", Propagation Delay=1.3us, Radiation Hardening=No, REACH SVHC="No SVHC", Response Time=1.3us, Stock 1=46251, Supplier 1=Digi-Key, Turn-On Delay Time=1.3us, Type="General Purpose", Weight=0.01lb, Width=3.9mm
U15: "IC PWR SWITCH P-CHAN 1:1 SOT23-5", Manufacturer=Microchip, Supplier Part Number 1=576-2582-1-ND, Category="Hot Swap Controllers", ComponentLink1Description=http://components.arrow.com/part/dataview/42608079S9274031N1374?src-supplier=Arrow+Electronics, ComponentLink1URL=http://components.arrow.com/part/dataview/42608079S9274031N1374?src-supplier=Arrow+Electronics, ComponentLink2Description=http://uk.rs-online.com/webdocs/0f82/0900766b80f822a9.pdf?src-supplier=RSComponents, ComponentLink2URL=http://uk.rs-online.com/webdocs/0f82/0900766b80f822a9.pdf?src-supplier=RSComponents, ComponentLink3Description=http://components.arrow.com/part/dataview/0323_00165048?src-supplier=Arrow+Europe, ComponentLink3URL=http://components.arrow.com/part/dataview/0323_00165048?src-supplier=Arrow+Europe, ComponentLink4Description=http://www.mouser.com/ds/2/268/mic20xx-778478.pdf?src-supplier=Mouser, ComponentLink4URL=http://www.mouser.com/ds/2/268/mic20xx-778478.pdf?src-supplier=Mouser, ComponentLink5Description=http://www.farnell.com/datasheets/1670778.pdf?src-supplier=Element14, ComponentLink5URL=http://www.farnell.com/datasheets/1670778.pdf?src-supplier=Element14, ComponentLink6Description=http://www.microchip.com/mymicrochip/filehandler.aspx?ddocname=en579487&src-supplier=Digi-Key, ComponentLink6URL=http://www.microchip.com/mymicrochip/filehandler.aspx?ddocname=en579487&src-supplier=Digi-Key, ComponentLink7Description=http://www.micrel.com/_PDF/mic20xx.pdf?src-supplier=Future+Electronics, ComponentLink7URL=http://www.micrel.com/_PDF/mic20xx.pdf?src-supplier=Future+Electronics, Manufacturer Part Number=MIC2004-0.5YM5-TR, Pricing 1="1=0.79000, 25=0.65000, 100=0.59000 (USD)", RoHS=Yes, Stock 1=5462, Supplier 1=Digi-Key

## Free pads (board coordinates)
  round 60 hole 78.74: MH1(118.11,2420.26) MH2(118.11,97.43) MH3(2397.87,97.43) MH4(2397.87,2420.26)

## Via types
v1: diameter 23.62, hole 15.75, Top Layer to Bottom Layer, 821 vias
v2: diameter 23.62, hole 15.75, Top Layer to Bottom Layer, tented both sides, 19 vias

## Nets (pads, with @x,y where several pads share a name; then routed paths per layer and width w, separated by ;. In a path a pad name is that pad's centre, name@x,y a point inside that pad or via, vN(x,y) a via of type N, cw(c..) or ccw(c..) an arc to the next point about the centre after c; other vN are vias at no path point)
3V3: C12.1 C13.1 C22.1 C41.1 C76.1 C85.1 J1.1 P4.1 Q4.1 R24.2 R43.2 R55.1 R56.1 R83.1 RC1.2 U1.1 U1.10 U7.2 U10.5 | length 3520
  Top Layer w20: 1054.72,1859 1054.72,1846.28 1061,1840 ; C85.1@1141,1703 1141,1783 ; v1(1495,2169) 1571.71,2169 cw(c1571.71,2168) U7.2@1572.71,2168 ; v1@1671,2033 ccw(c1671,2034) v1@1672,2034
  Top Layer w22: 1048,482 1048,93 1087,54 1659,54 ; v1(2085,1237) 2122,1237 J1.1@2138,1253
  Top Layer w25: v2@874,1887 ccw(c902,1887) 902,1859 R55.1@986,1859 1054.72,1859 1120,1859 1121,1860 ; v1(2332,1618) 2341,1627 R56.1@2341,1659
  Top Layer w40: P4.1@891.38,1049 891.38,976.3 ccw(c927.67,976.3) 927.67,940 cw(c927.67,902.67) 965,902.67 965,579 ccw(c967,579) 967,577
  Bottom Layer w12: 2238,1717 cw(c2245,1717) 2245,1724
  Bottom Layer w20: R24.2@1092,2403 1445.34,2403 cw(c1445.34,2353.34) 1495,2353.34 v1(1495,2169)
  Bottom Layer w22: 2245,1724 2260,1724 ccw(c2260,1739) 2275,1739
  Bottom Layer w25: v2(871,1894) RC1.2@871,1943 ; v1(2085,1237) 2150,1237 2332,1419 v1(2332,1618) 2332,1716.34 ; 2275,1739 2309.34,1739 ; 2309.34,1739 cw(c2309.34,1716.34) 2332,1716.34 ; 2309.34,1739 cw(c2309.34,1716.34) 2332,1716.34
  other v1: 968,765 1415,1703 1663,2037 1414,2165
3V3_Audio: C1.1 C2.1 C3.1 C4.1 C37.1 C38.1 R2.2 U2A.5 U3.5 U3A.5 U4.13 U5.1 | length 2581.3
  Top Layer w12: U4.13@2160.35,621.8 2198,621.8 2198,622 2219,599
  Top Layer w18: 2212,606 2219,599 2231.39,586.61 v1(2246,586.61)
  Top Layer w22: v1(2246,453) v1(2401,453) ; C1.1@2259,584 C2.1@2259,631 ; U3A.5@2457.4,234.82 2457.4,187 ccw(c2470.4,187) 2470.4,174 v1(2480,174)
  Top Layer w40: 1889,204 1980,204 2007.12,204 ccw(c2007.12,232.7) 2035.82,232.7 U2A.5@2035.82,259.53
  Bottom Layer w22: v2(942,286) 942,171 952,161 1225,161 1865,161 v2(1883,161) ; v1(2401,453) 2401,435 ccw(c2418,435) 2418,418 2458.06,418 cw(c2458.06,395.06) 2481,395.06 2481,175 cw(c2480,175) v1(2480,174)
  Bottom Layer w40: v1@2036,237 cw(c2074,237) 2074,275 2214,275 ccw(c2214,307) 2246,307 2246,397 ; R2.2@2192,422 2221,422 cw(c2221,397) 2246,397 ; v1(2246,586.61) v1(2246,453) 2246,397
  other v1: 2036,231
3V3_SENS: C7.1 C28.1 C29.1 R4.2 R5.2 U2.1 U2.2 U2.4 U6.5 | length 518
  Top Layer w8: U2.2@864.67,59.13 U2.1@864.67,43.38 864.67,33.27 ccw(c872.94,33.27) 872.94,25 C28.1@916,25
  Top Layer w10: U2.4@864.67,90.62 876.38,90.62 882,85 882,46 887.44,40.56 C28.1@912,40.56
  Top Layer w12: U6.5@2172.09,81 2200,81 cw(c2200,71) 2210,71 v1(2210,53)
  Top Layer w22: C29.1@969.56,40.56 ccw(c969.56,48) C29.1@977,48
  Bottom Layer w12: 1939,19 ccw(c1939,27) 1947,27
  Bottom Layer w22: v2(1762,19) 1939,19
  Bottom Layer w40: R4.2@1951,138 1951,67 1959,59
#12-P: R8.2 U4.1 U7.27 | length 1675.3
  Top Layer w8: v1(1894,698) v1@1894,698.57
  Top Layer w12: v1@1894,698.57 U4.1@1947.75,698.57
  Top Layer w20: R8.2@1982,754 2338,754 ccw(c2338,804) 2388,804 2388,1683.1 ccw(c2364.1,1683.1) 2364.1,1707 2323,1707 ccw(c2323,1687) 2303,1687 2303,1676 2293,1666 U7.27@2247.29,1666
  Top Layer w22: v1(1944,754) R8.2@1982,754
  Bottom Layer w22: v1(1894,698) 1894,726.05 cw(c1920.95,726.05) 1920.95,753 v1@1939,753
#12-S: R7.1 U4.3 | length 112.6
  Top Layer w8: U4.3@1947.75,647.39 U4.3@1947.75,648
  Top Layer w12: v2(1894,647) 1894,647.39 U4.3@1947.75,647.39
  Bottom Layer w22: v2@1892,648 cw(c1904,648) 1904,660 R7.1@1942,660 R7.1@1943,660
#13-P: R10.2 U4.16 U7.30 | length 1700.3
  Top Layer w12: U4.16@2160.35,698.57 2206,698.57
  Top Layer w20: 2206,698.57 2383.39,698.57 ccw(c2383.39,732.18) 2417,732.18 2417,1789.51 ccw(c2388.51,1789.51) 2388.51,1818 U7.30@2242,1818
  Bottom Layer w22: R10.2@2164,745 2188.31,745 cw(c2188.31,728.31) 2205,728.31 2205,712 ccw(c2219,712) 2219,698 v1(2306,698)
#13-S: R9.1 U4.14 | length 113.8
  Top Layer w12: U4.14@2160.35,647.39 2213.39,647.39 v1(2214,648)
  Bottom Layer w22: R9.1@2161,660 ccw(c2173,660) 2173,648 v1(2214,648)
#14-P: R12.2 U4.9 U7.31 | length 1796.1
  Top Layer w12: U4.9@2160.35,519.43 2217,519.43
  Top Layer w20: 2217,519.43 2324.43,519.43 2358,553 R12.2@2399,553 2427,553 ccw(c2427,570) 2444,570 2444,1842 ccw(c2418,1842) 2418,1868 U7.31@2242,1868
#14-S: R11.1 U4.11 | length 91
  Top Layer w12: U4.11@2160.35,570.61 v1(2203.39,570.61)
  Bottom Layer w22: R11.1@2162,586 2185.84,586 ; 2187.84,586 cw(c2187.84,570.61) v1@2203.23,570.61
#15-P: R14.2 U4.8 U7.37 | length 2283.4
  Top Layer w20: 2074,486 2433.73,486 ccw(c2433.73,525.27) 2473,525.27 2473,2140.68 ccw(c2445.68,2140.68) 2445.68,2168 U7.37@2242,2168
#15-S: R13.1 U4.6 | length 120.4
  Top Layer w12: v1(1890,570) 1890,570.61 U4.6@1947.75,570.61
  Bottom Layer w22: v1@1889,572 cw(c1903,572) 1903,586 R13.1@1943,586
#_OUT_MIC: R1.2 R7.2 R9.2 R11.2 R13.2 U2A.4
  other v1: 2031,317
#O_MIC: P9.1 U3A.1 U3A.4 U7.7 | length 4306.2
  Top Layer w20: U7.7@1572.71,1918 1682,1918 ccw(c1682,1950) 1714,1950 v1(1714,2097) ; U3A.4@2382.6,234.82 2382.6,275.06 cw(c2393.53,275.06) 2393.53,286 2449,286 ccw(c2449,295) 2458,295 2458,337.18 U3A.1@2457.4,337.18
  Top Layer w22: P9.1@1352.75,1049 P9.1@1352.94,1049 1353,1049 v1(1353,1120) ; v1(1371,1807) 1338,1807 cw(c1338,1832) 1313,1832 1313,1892.51 cw(c1336.49,1892.51) 1336.49,1916 U7.7@1578,1916 ; U3A.1@2457.4,337.18 v1@2457.4,452.6
  Bottom Layer w20: v1(1714,2097) 1714,2139 cw(c1740,2139) 1740,2165 2459,2165 cw(c2459,2146) 2478,2146 2478,483 2478,476 cw(c2457,476) v1(2457,455)
  Bottom Layer w22: v1(1353,1120) ccw(c1353,1138) 1371,1138 v1(1371,1807)
#OUT_MIC: C9.1 U2A.1 U4.2 U4.7 U4.10 U4.15 | length 1069
  Top Layer w12: U4.7@1947.75,545.02 2013,545 ; U4.2@1947.75,672.98 1998,672.98 ; 2108,672.98 U4.15@2160.35,672.98 2284.02,672.98 cw(c2284.02,667) v1(2290,667) ; 2112,545.02 U4.10@2160.35,545.02 2282.02,545.02 ccw(c2282.02,554) 2291,554 v1@2287,550
  Bottom Layer w20: v1(2139,223) 2251,223 ccw(c2251,262) 2290,262 v1(2290,550) v1(2290,667)
A_REG: Q5.1 R36.1 U7.11 | length 2425.8
  Top Layer w22: v1(1206,1592) 1206,1549.17 ccw(c1228.17,1549.17) 1228.17,1527 1460,1527 ccw(c1460,1551) v1(1484,1551) ; U7.11@1578,1716 v1(1636,1716)
  Bottom Layer w22: R36.1@606,380 cw(c606,375.4) 610.6,375.4 Q5.1@610.6,321.37 ; 622,437 738,437 760,459 760,1396 cw(c860,1396) 860,1496 1177,1496 ccw(c1177,1525) 1206,1525 v1(1206,1592) ; v1(1484,1551) 1526.75,1551 ccw(c1526.75,1583.25) 1559,1583.25 1559,1690.17 cw(c1595,1678) 1595,1716 v1(1636,1716)
AC_LINE: J2.1 J7.1 P20.1 | length 880.2
  Top Layer w40: J7.1@-102,1326 196,1326 368.98,1326 cw(c368.98,1264.4) 430.58,1264.4 430.58,1133 J2.1@434.08,1133 ; J2.1@434.08,1113.5 509.96,1113.5 cw(c509.96,1075.96) 547.5,1075.96 P20.1@547.5,1049
  Bottom Layer w22: J7.1@-102,1326 ccw(c-92,1326) J7.1@-92,1316
AC_Neutral: J2.2 J7.2 P19.1 | length 1544.5
  Top Layer w22: J2.2@436.08,934.5 ccw(c474.58,934.5) J2.2@436.72,927.5
  Top Layer w40: J2.2@409,927.5 J2.2@434.08,927.5 J2.2@436.72,927.5 ; J2.2@436.08,934.5 ccw(c443.58,934.5) 443.58,927 721.36,927 ccw(c721.36,981.96) 776.31,981.96 P19.1@776.31,1049
  Bottom Layer w40: J7.2@-102,1526 140.1,1526 cw(c140.1,1477.1) 189,1477.1 189,977.49 ccw(c238.49,977.49) 238.49,928 v1(409,928)